# Altium PCB FULL_CB_REV_C.PcbDoc (part 1 of 2)
Units mm, origin at the board's own origin, x right, y up, seen from the top; angles counter-clockwise.
Board outline 86.1 x 38.5 mm, 4 copper layers (Top Layer, Signal Layer 2, Signal Layer 1, Bottom Layer), stack 1.643 mm thick; 96 components, 165 nets, 587 pads, 270 vias.
Unrouted connection lines stored in the file: 6.
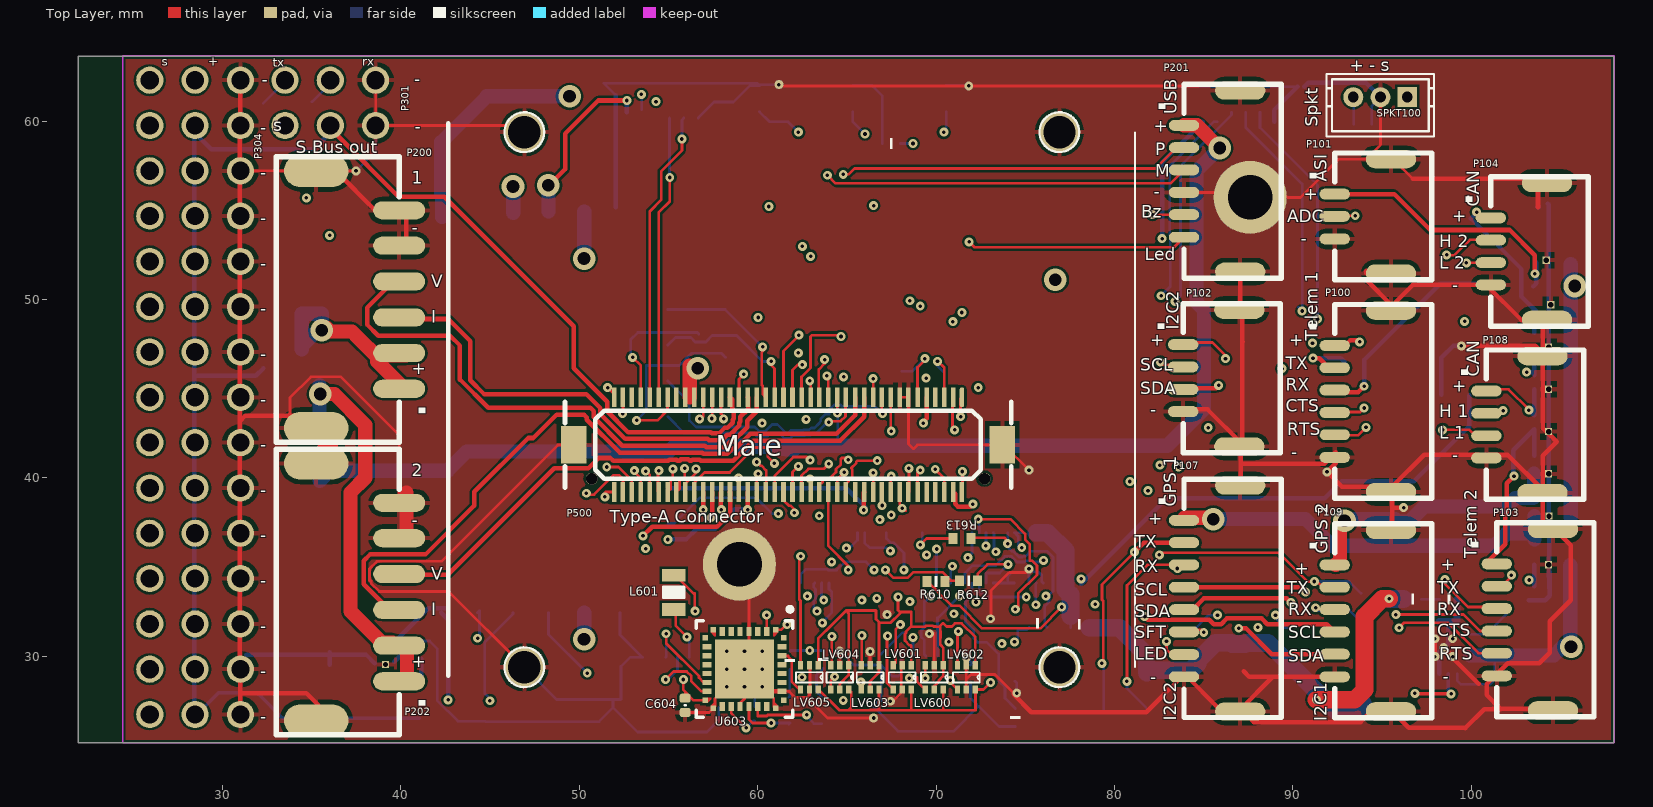
[diagram p0: Top Layer view]
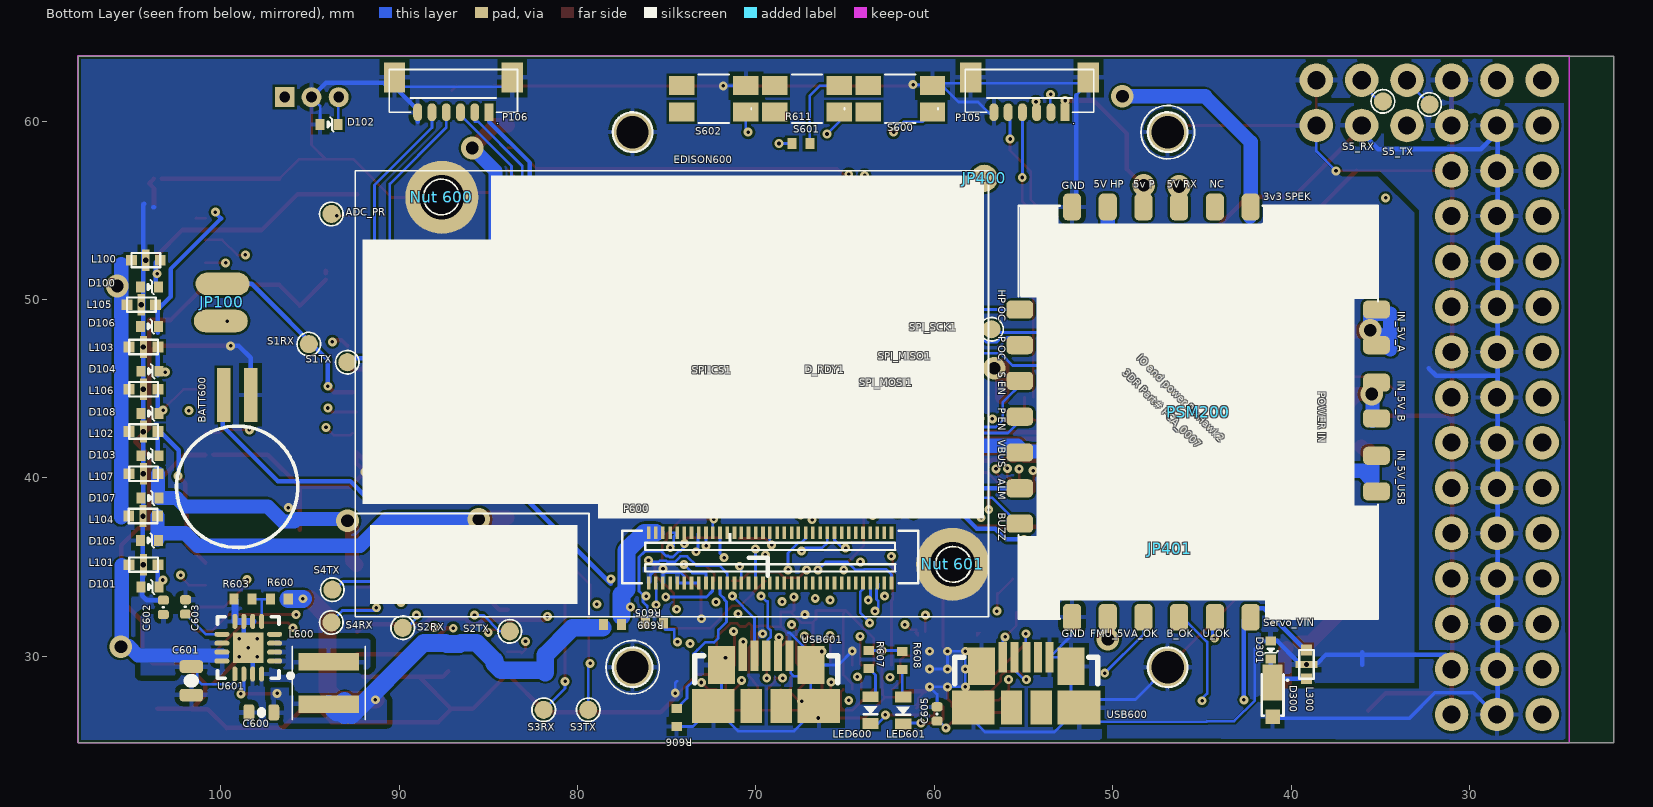
[diagram p1: Bottom Layer view, seen from below]
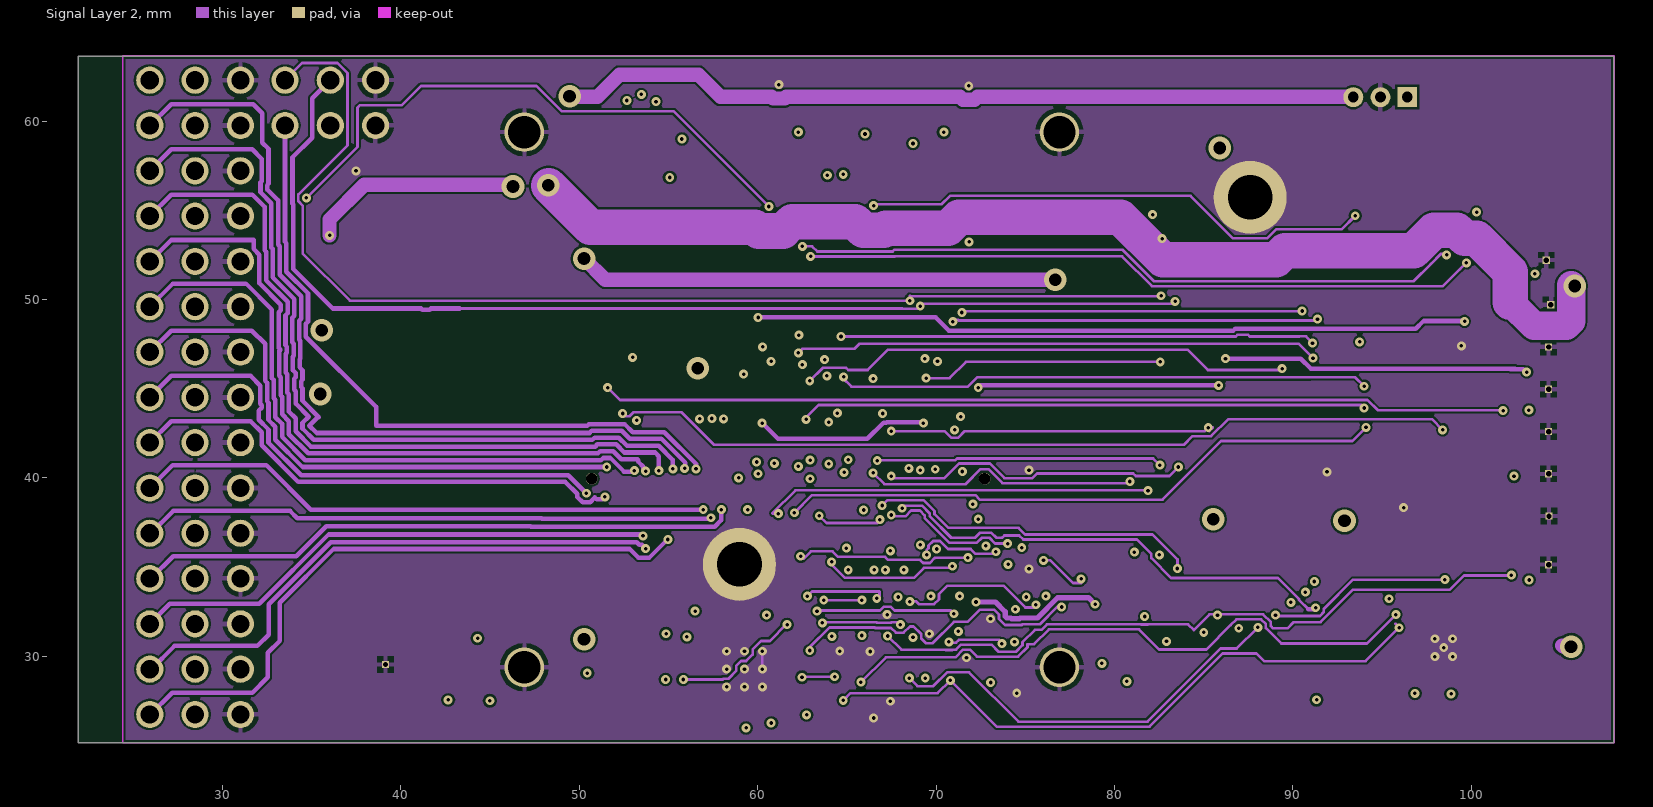
[diagram p2: Signal Layer 2]
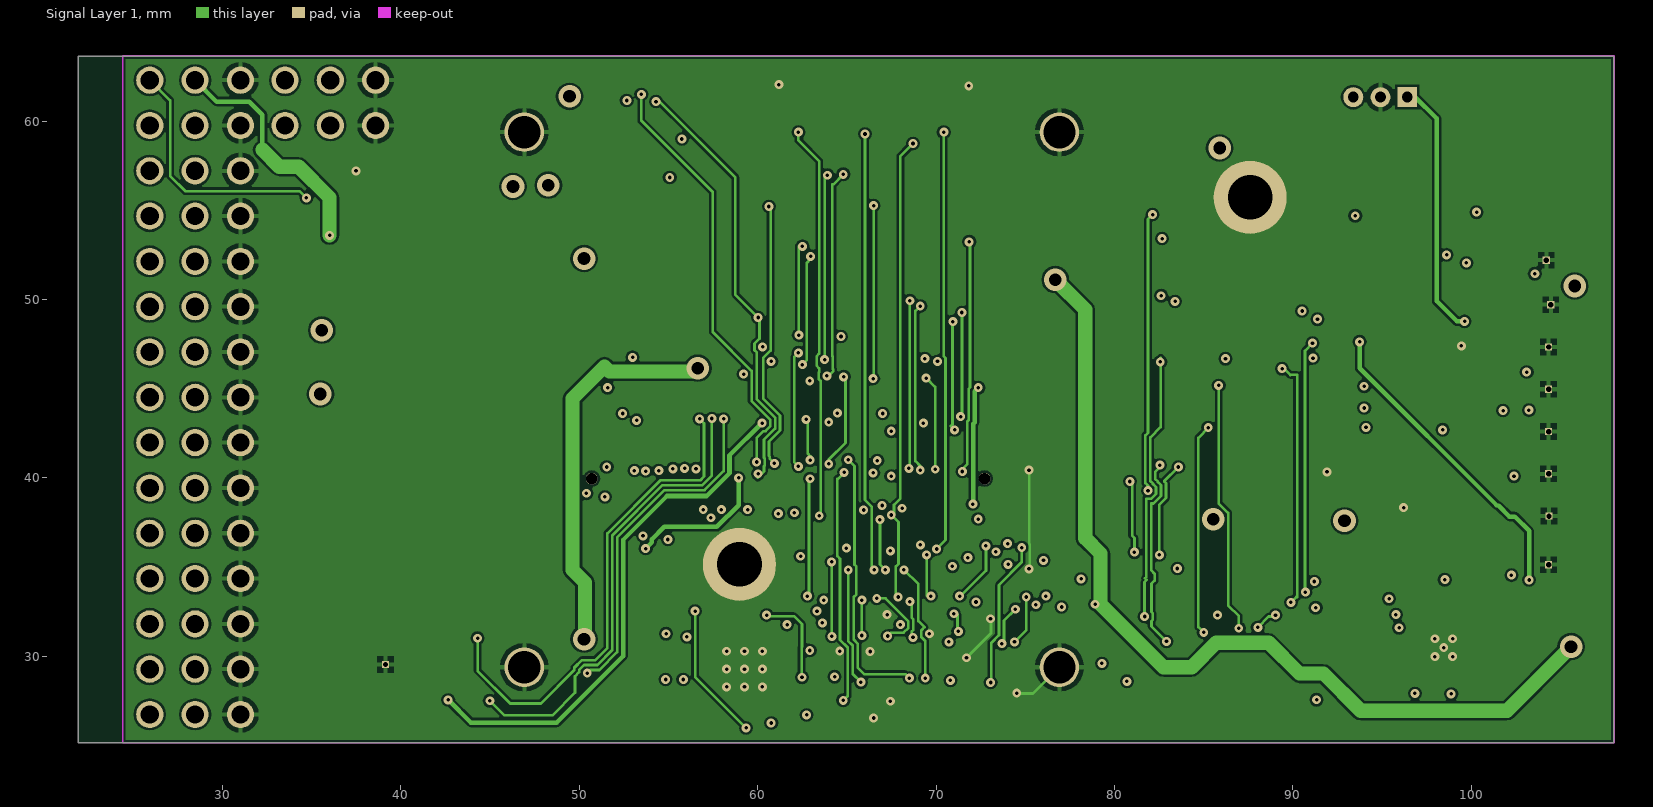
[diagram p3: Signal Layer 1]
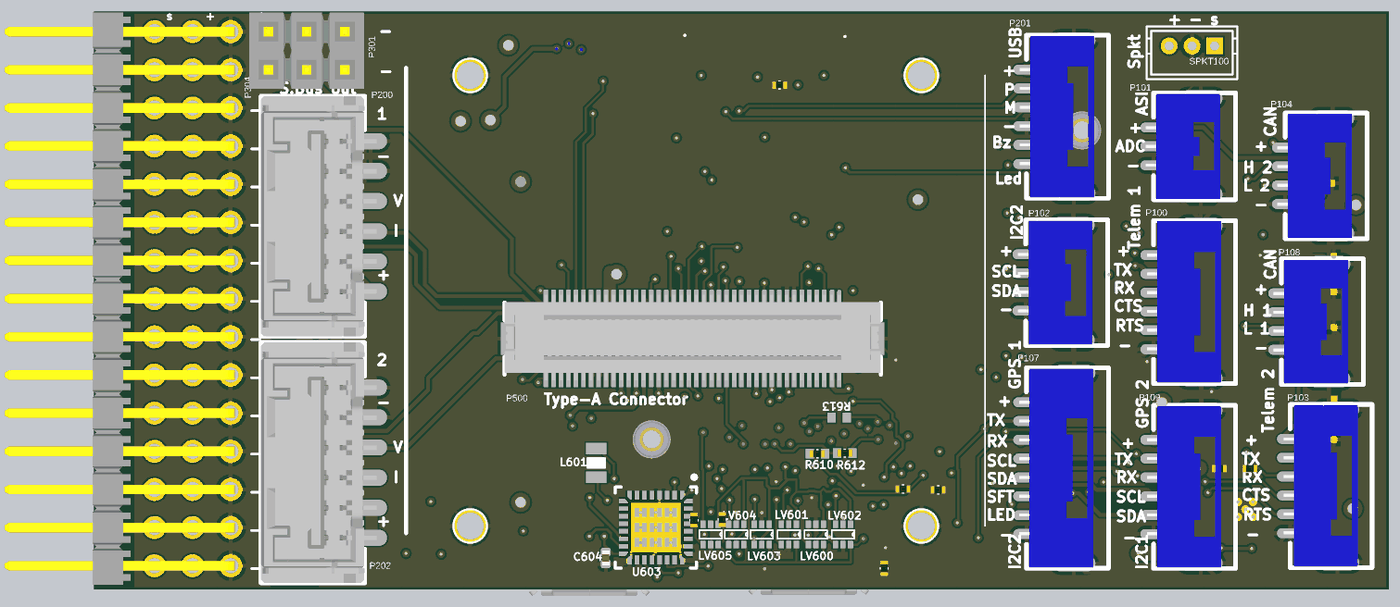
[diagram p5: 3D render of the assembled board from above, using the file's embedded part models]
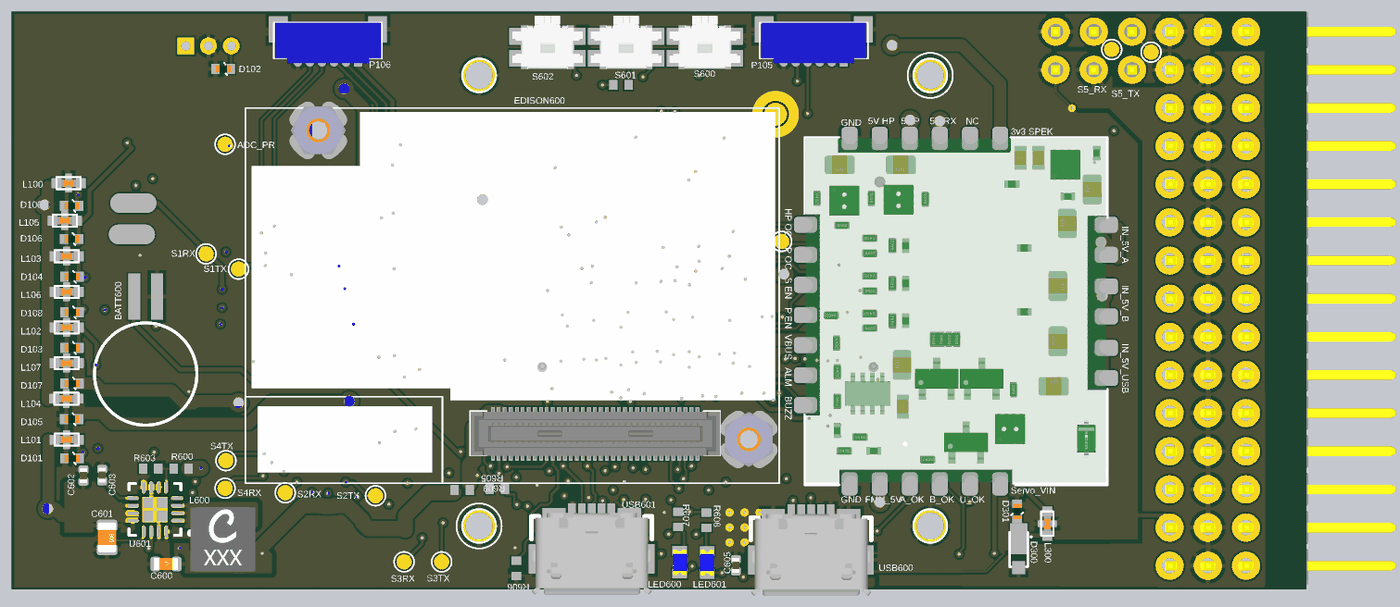
[diagram p6: 3D render of the assembled board from below, using the file's embedded part models]

## Layer stack, top to bottom
Top Solder: solder mask 0.0102, Solder Resist, Dk 3.5
Top Layer: signal copper 0.0356
Dielectric 1: core 0.5, FR-4, Dk 4.8
Signal Layer 2: signal copper 0.036
Dielectric 6: prepreg 0.5, Dk 4.2
Signal Layer 1: signal copper 0.036
Dielectric 4: core 0.5, Dk 4.2
Bottom Layer: signal copper 0.0356
Bottom Solder: solder mask 0.0102, Solder Resist, Dk 3.5

## Board outline
21.9,25.15 108,25.15 108,63.65 21.9,63.65

## Design rules (kind name [scope] priority, off if disabled: settings)
Clearance "Polygon clearance" [InPolygon vs InPolygon] p1: gap=0.3 ignorepadtopadclearanceinfootprint=FALSE except(0: Arc-Hole Track-Hole SMDPad-Hole THPad-Hole Via-Hole Fill-Hole Poly-Hole Region-Hole Text-Hole)
Clearance Clearance_1 [All] p2: gap=0.127 ignorepadtopadclearanceinfootprint=FALSE except(0: Arc-Hole Track-Hole SMDPad-Hole THPad-Hole Via-Hole Fill-Hole Poly-Hole Region-Hole Text-Hole)
Clearance mdViaVia [IsVia vs IsVia] p3: gap=0.127 ignorepadtopadclearanceinfootprint=FALSE except(0: Arc-Hole Track-Hole SMDPad-Hole THPad-Hole Via-Hole Fill-Hole Poly-Hole Region-Hole Text-Hole)
Clearance mdPadVia [IsPad vs IsVia] p4: gap=0.127 ignorepadtopadclearanceinfootprint=FALSE except(0: Arc-Hole Track-Hole SMDPad-Hole THPad-Hole Via-Hole Fill-Hole Poly-Hole Region-Hole Text-Hole)
Clearance mdPadPad [IsPad vs IsPad] p5: gap=0.127 ignorepadtopadclearanceinfootprint=FALSE except(0: Arc-Hole Track-Hole SMDPad-Hole THPad-Hole Via-Hole Fill-Hole Poly-Hole Region-Hole Text-Hole)
Clearance mdWireVia [(InLayerClass('Signal Layers') AND IsTrack) vs IsVia] p6: gap=0.127 ignorepadtopadclearanceinfootprint=FALSE except(0: Arc-Hole Track-Hole SMDPad-Hole THPad-Hole Via-Hole Fill-Hole Poly-Hole Region-Hole Text-Hole)
Clearance mdWirePad [(InLayerClass('Signal Layers') AND IsTrack) vs IsPad] p7: gap=0.127 ignorepadtopadclearanceinfootprint=FALSE except(0: Arc-Hole Track-Hole SMDPad-Hole THPad-Hole Via-Hole Fill-Hole Poly-Hole Region-Hole Text-Hole)
Clearance mdWireWire [(InLayerClass('Signal Layers') AND IsTrack) vs (InLayerClass('Signal Layers') AND IsTrack)] p8: gap=0.127 ignorepadtopadclearanceinfootprint=FALSE except(0: Arc-Hole Track-Hole SMDPad-Hole THPad-Hole Via-Hole Fill-Hole Poly-Hole Region-Hole Text-Hole)
ComponentClearance ComponentClearance_1 [(HasFootprint('ed') OR HasFootprint('CON-DF17-80M') OR HasFootprint('DF40-70_RECEPTICAL') OR HasFootprint('PSM') OR HasFootprint('PEM-SMTSO-M1.6-2-ET') OR HasFootprint('HEADER_1X06-FTDI') OR HasFootprint('3DR-WORDMARK-short'))] p1: gap=0 collisioncheckmode=3 verticalgap=0 showdistances=FALSE
ComponentClearance [All] p2 off: gap=0.076 collisioncheckmode=3 verticalgap=0 showdistances=FALSE
HoleSize [All] p1: absolutevalues=TRUE maxlimit=2540 minlimit=0.2 maxpercent=80.000 minpercent=20.000
HoleToHoleClearance [All] p1: gap=0.203 allowstackedmicrovias=TRUE
MinimumSolderMaskSliver [All] p1 off: minsoldermaskwidth=0.254
PasteMaskExpansion [All] p1: expansion=0.025
PolygonConnect PolygonConnect_1 [(InComponent('U2') OR InComponent('L6') OR HasFootprint('PEM-SMTSO-M1.6-2-ET') OR HasFootprint('MOUNT-HOLE1.8'))] p1: connectstyle=Direct reliefconductorwidth=0.254 reliefentries=4 polygonreliefangle="90 Angle" airgapwidth=0.254
PolygonConnect ThermalVias [IsVia] p2: connectstyle=Direct reliefconductorwidth=0.254 reliefentries=4 polygonreliefangle="90 Angle" airgapwidth=0.254
PolygonConnect [All] p3: connectstyle=Relief reliefconductorwidth=0.254 reliefentries=4 polygonreliefangle="90 Angle" airgapwidth=0.254
RoutingVias [All] p1: holewidth=0.2 width=0.5 viastyle="Through Hole" minholewidth=0.2 minwidth=0.5 maxholewidth=0.711 maxwidth=1.27
SilkToBoardRegionClearance [All] p1 off:
SilkToSilkClearance [All] p1 off: silktosilkclearance=0.254
SilkToSolderMaskClearance [IsPad] p1 off: minsilkscreentomaskgap=0.254 clearancetoexposedcopper=TRUE
SolderMaskExpansion [All] p1: expansion=0.025
Width [All] p1: maxlimit=2 minlimit=0.15 preferedwidth=0.254
22 further rules are at their usual default settings.

## Classes and differential pairs
component class FULL_CB_Plugs_REV_C: 3 D100 D101 D102 D103 D104 D105 D106 D107 D108 JP100 L100 L101 L102 L103 L104 L105 L106 L107 P100 P101 P102 P103 P104 P105 P106 P107 P108 P109 SPKT100
component class FULL_CB_Power_REV_C: P200 P201 P202 PSM200
component class FULL_CB_Servo_REV_C: D300 D301 L300 P301 P304
component class FULL_CB_tp_REV_C: ADC_PR D_RDY1 JP400 JP401 S1RX S1TX S2RX S2TX S3RX S3TX S4RX S4TX S5_RX S5_TX SPI!CS1 SPI_MISO1 SPI_MOSI1 SPI_SCK1
component class FULL_CB_80_Pin_REV_C: FIDUCIALS1 P500
component class FULL_CB_INTEL_REV_C: BATT600 C600 C601 C602 C603 C604 C605 EDISON600 L600 L601 LED600 LED601 LV600 LV601 LV602 LV603 LV604 LV605 "Nut 600" "Nut 601" P600 R600 R603 R605 R606 R607 R608 R609 R610 R611 R612 R613 S600 S601 S602 U601 U603 USB1 USB2 USB600 USB601

## Components (designator, comment, footprint, x,y, rotation, side; value= is the part's Value field where it differs from the comment)
ADC_PR "PAD.04" PAD.04X.04 93.8,54.8 r0 bottom
BATT600 "" MS621FE 99.08,39.503 r90 bottom
C600 "" 0603-CAP 97.727,26.854 r0 bottom
C601 "10.00UF" 0805-CAP 101.651,28.626 r270 bottom
C602 "0u1" 0402-CAP 103.22,32.747 r90 bottom
C603 "33000pf" 0402-CAP 101.976,32.772 r90 bottom
C604 "0u1" 0402-CAP 55.931,27.254 r270 top
C605 "0u1" 0402-CAP 59.842,26.772 r90 bottom
D100 "DIODE-TVS" 0402-TVS 104,50.7 r0 bottom
D101 "DIODE-TVS" 0402-TVS 103.974,33.89 r0 bottom
D102 "DIODE-TVS" 0402-TVS 93.924,59.823 r0 bottom
D103 "DIODE-TVS" 0402-TVS 103.974,41.246 r0 bottom
D104 "DIODE-TVS" 0402-TVS 103.974,45.986 r0 bottom
D105 "DIODE-TVS" 0402-TVS 104,36.5 r0 bottom
D106 "DIODE-TVS" 0402-TVS 104,48.5 r0 bottom
D107 "DIODE-TVS" 0402-TVS 103.974,38.876 r0 bottom
D108 "DIODE-TVS" 0402-TVS 103.974,43.616 r0 bottom
D300 "MSS1P4-M3" MICROSMP 41.037,27.28 r270 bottom
D301 "DIODE-TVS" 0402-TVS 41.139,30.353 r90 bottom
D_RDY1 "PAD.04" PAD.04X.04 68.072,45.974 r180 bottom
EDISON600 "Ed" ED 87.63,55.753 r270 bottom locked
JP100 "HEADER_2MM_RA_SMD" HEADER_2MM_RA_2 100.799,49.846 r90 bottom
JP400 "FIDUCIAL1.5X3" FIDUCIAL-1.5X3 57.2,56.8 r180 bottom
JP401 "FIDUCIAL1.5X3" FIDUCIAL-1.5X3 46.787,36.043 r90 bottom
L100 "Kyocera KNH16C104DA5TS EMI filter" KYOCERA-KNH16-DA 104.211,52.208 r180 bottom
L101 "Kyocera KNH16C104DA5TS EMI filter" KYOCERA-KNH16-DA 104.338,35.135 r180 bottom
L102 "Kyocera KNH16C104DA5TS EMI filter" KYOCERA-KNH16-DA 104.338,42.602 r180 bottom
L103 "Kyocera KNH16C104DA5TS EMI filter" KYOCERA-KNH16-DA 104.338,47.342 r180 bottom
L104 "Kyocera KNH16C104DA5TS EMI filter" KYOCERA-KNH16-DA 104.361,37.863 r180 bottom
L105 "Kyocera KNH16C104DA5TS EMI filter" KYOCERA-KNH16-DA 104.465,49.712 r180 bottom
L106 "Kyocera KNH16C104DA5TS EMI filter" KYOCERA-KNH16-DA 104.338,44.972 r180 bottom
L107 "Kyocera KNH16C104DA5TS EMI filter" KYOCERA-KNH16-DA 104.338,40.232 r180 bottom
L300 "Kyocera KNH16C104DA5TS EMI filter" KYOCERA-KNH16-DA 39.132,29.54 r90 bottom
L600 "XFL4020-222MEB" XFL4020 93.949,28.505 r270 bottom
L601 "" 0805-IND 55.296,33.579 r90 top
LED600 "BLUE" 0603-LED-BLUE 63.576,26.975 r90 bottom
LED601 "BLUE" 0603-LED-BLUE 61.747,26.949 r90 bottom
LV600 "SN74LVC1T45" DRL 70.4,29.5 r270 top
LV601 "SN74LVC1T45" DRL 68.6,29.5 r270 top
LV602 "SN74LVC1T45" DRL 72.2,29.5 r270 top
LV603 "SN74LVC1T45" DRL 66.8,29.5 r270 top
LV604 "SN74LVC1T45" DRL 65.1,29.5 r270 top
LV605 "SN74LVC1T45" DRL 63.4,29.5 r270 top
"Nut 600" "PEM-SMTSO-M1.6-2-ET" PEM-SMTSO-M1.6-2-ET 87.605,55.728 r90 bottom
"Nut 601" "PEM-SMTSO-M1.6-2-ET" PEM-SMTSO-M1.6-2-ET 58.979,35.154 r180 bottom
P100 "JST_GH_V6" JST_GH_V6 97.8,44.3 r270 top
P101 "JST_GH_V3" JST_GH_V3 97.8,54.667 r270 top
P102 "JST_GH_V4" JST_GH_V4 89.3,45.6 r270 top
P103 "JST_GH_V6" JST_GH_V6 106.883,32.055 r270 top
P104 "JST_GH_V4" JST_GH_V4 106.553,52.705 r270 top
P105 "JST_SUR_6" JST_SUR_H6 54.661,62.5 r0 bottom
P106 "JST_SUR_6" JST_SUR_H6 86.961,62.5 r0 bottom
P107 "JST_GH_V8" JST_GH_V8 89.35,33.25 r270 top
P108 "JST_GH_V4" JST_GH_V4 106.3,43 r270 top
P109 "JST_GH_V6" JST_GH_V6 97.8,32 r270 top
P200 "CLICKMATE_2_6" CLICKMATE_V6_2MM 33,50 r90 top
P201 "JST_GH_V6" JST_GH_V6 89.35,56.642 r270 top
P202 "CLICKMATE_2_6" CLICKMATE_V6_2MM 33,33.6 r90 top
P301 "con 2x6" TSW-103-07-G-D 36.04,62.3 r90 top
P304 "PH_2 Servo header" TSW-115-08-G-T-RA 28.46,44.52 r0 top
P500 "CON-DF17-80M" ? 61.697,41.859 r0 top
P600 "DF40-70_RECEPTICAL" DF40-70_RECEPTICAL 69.054,35.56 r90 bottom locked
PSM200 "Power Selection module" PSM 44.958,43.942 r270 bottom
R600 "47K  1%" 0402-RES 96.718,33.204 r180 bottom
R603 "10.5K  1%" 0402-RES 98.75,33.204 r180 bottom
R605 "100K" 0402-RES 75.692,31.852 r180 bottom
R606 "10K" 0402-RES 74.439,26.568 r270 bottom
R607 "220R" 0402-RES 63.678,29.82 r270 bottom
R608 "220R" 0402-RES 61.798,29.769 r270 bottom
R609 "0R" 0402-RES 78.029,31.79 r180 bottom
R610 "10K" 0402-RES 70,34.2 r0 top
R611 "220R" 0402-RES 67.488,58.75 r0 bottom
R612 "220R" 0402-RES 71.831,34.239 r0 top
R613 "10K" 0402-RES 71.45,36.601 r0 top
S1RX "PAD.04" PAD.04X.04 95.067,47.504 r0 bottom
S1TX "PAD.04" PAD.04X.04 92.908,46.488 r0 bottom
S2RX "PAD.04" PAD.04X.04 89.8,31.6 r0 bottom
S2TX "PAD.04" PAD.04X.04 83.8,31.4 r0 bottom
S3RX "PAD.04" PAD.04X.04 81.9,27 r0 bottom
S3TX "PAD.04" PAD.04X.04 79.4,27 r0 bottom
S4RX "PAD.04" PAD.04X.04 93.8,31.9 r180 bottom
S4TX "PAD.04" PAD.04X.04 93.746,33.738 r180 bottom
S5_RX "PAD.04" PAD.04X.04 34.849,61.112 r135 bottom
S5_TX "PAD.04" PAD.04X.04 32.233,60.935 r135 bottom
S600 "Power" EVQP7J01K 61.9,61.265 r0 bottom
S601 "FWR_RCVR" EVQP7J01K 67.132,61.265 r0 bottom
S602 "RCVR_MODE" EVQP7J01K 72.365,61.265 r0 bottom
SPI!CS1 "PAD.04" PAD.04X.04 70.409,45.949 r0 bottom
SPI_MISO1 "PAD.04" PAD.04X.04 58.191,46.761 r0 bottom
SPI_MOSI1 "PAD.04" PAD.04X.04 59.055,45.212 r180 bottom
SPI_SCK1 "PAD.04" PAD.04X.04 56.794,48.336 r90 bottom
SPKT100 "CONN_SPEKTRUM_RX-TH" B3B-ZR 94.914,61.347 r180 top
U601 "TPS62130RGTT" RGT16-1700X1700TP 98.461,30.486 r0 bottom
U603 "FT232RQ-Reel" PQFN5X5-32_V 59.258,29.286 r270 top
USB600 "MICRO USB B, BOTTOM MOUNT" MOLEX-47346-0001 54.839,27.127 r90 bottom
USB601 "MICRO USB B, BOTTOM MOUNT" MOLEX-47346-0001 69.418,27.203 r90 bottom

## Footprints (in the part's own frame and the unit in brackets; to place one, negate y for a bottom-side part, rotate by r counter-clockwise, add the part's x,y. Pads: shape width x height; smd on the part's side, far side on the other; paste and mask are expansions set on the pad)
0402-CAP [mil]
  rrect50% 20x24 smd mask+0: P$1(-15.75,0) P$2(15.75,0)
  silkscreen extent 0,0 0,1, body extent -20,-10 20,10, height 20
0402-RES [mil] "0402-RES"
  rect 20x24 smd: P$1(19.68,0) P$2(-20,0)
  body extent -20,-10 20,10, height 20
0402-TVS [mil] "0402-TVS"
  rect 20x24 smd: A(20,0) C(-19.68,0)
  silkscreen extent -10,-16 3,16, body extent -20,-10 20,10, height 20
0603-CAP [mil] "0603-CAP"
  rrect50% 24x36 smd mask+0: P$1(-27.56,0) P$2(27.56,0)
  silkscreen extent 0,-2 0,2, body extent -31,-16 31,16, height 34
0603-LED-BLUE [mil] "0603-LED_Blue"
  rect 24x36 smd: A(30,0) C(-29.53,0)
  silkscreen extent -9,-15 9,15, body extent -33,-18 33,18, height 35
0805-CAP [mil]
  rrect50% 28x52 smd mask+0: P$1(-31.5,0) P$2(31.5,0)
  silkscreen extent 0,-2 0,2, body extent -39,-25 39,25, height 31
0805-IND [mil]
  rect 28x52 smd: P$1(-37.4,0) P$2(38,0)
  silkscreen extent -12,-23 12,23
B3B-ZR [mil]
  rect 44x44 hole 24: 1(-59.06,0)
  round 44 hole 24: 2(0,0) 3(60,0)
  silkscreen extent -118,-51 119,87
CLICKMATE_V6_2MM [mil]
  rrect100% 40x115 smd: 1(-196.85,-271.65) 2(-118.11,-271.65) 3(-39.37,-271.65) 4(40,-271.65) 5(119,-271.65) 6(197,-271.65)
  rrect100% 71x142 smd: GND(-283.46,-88.58) GND(284,-88.58)
  silkscreen extent -315,-272 315,0, body extent -315,-303 315,0, height 295
DF40-70_RECEPTICAL [mil]
  rect 28x8 smd: 1(-57.09,273.5) 2(54,273.5) 3(-57.09,258.5) 4(54,258.5) 5(-57.09,242.5) 6(54,242.5) 7(-57.09,226.5) 8(54,226.5) 9(-57.09,210.5) 10(54,210.5) 11(-57.09,195.5) 12(54,195.5) 13(-57.09,179.5) 14(54,179.5) 15(-57.09,163.5) 16(54,163.5) 17(-57.09,147.5) 18(54,147.5) 19(-57.09,132.5) 20(54,132.5) 21(-57.09,116.5) 22(54,116.5) 23(-57.09,100.5) 24(54,100.5) 25(-57.09,84.5) 26(54,84.5) 27(-57.09,69.5) 28(54,69.5) 29(-57.09,53.5) 30(54,53.5) 31(-57.09,37.5) 32(54,37.5) 33(-57.09,21.5) 34(54,21.5) 35(-57.09,6.5) 36(54,6.5) 37(-57.09,-9.5) 38(54,-9.5) 39(-57.09,-25.5) 40(54,-25.5) 41(-57.09,-41.5) 42(54,-41.5) 43(-57.09,-56.5) 44(54,-56.5) 45(-57.09,-72.5) 46(54,-72.5) 47(-57.09,-88.5) 48(54,-88.5) 49(-57.09,-104.5) 50(54,-104.5) 51(-57.09,-120.37) 52(54,-120.37) 53(-57.09,-136.12) 54(54,-136.12) 55(-57.09,-151.87) 56(54,-151.87) 57(-57.09,-167.62) 58(54,-167.62) 59(-57.09,-183.37) 60(54,-183.37) 61(-57.09,-199.11) 62(54,-199.11) 63(-57.09,-214.86) 64(54,-214.86) 65(-57.09,-230.61) 66(54,-230.61) 67(-57.09,-246.36) 68(54,-246.36) 69(-57.09,-262.11) 70(54,-262.11)
  silkscreen extent -58,-321 58,332, body extent -68,-322 66,332, height 75
DRL [mm]
  rect 0.45x0.3 smd: 1(0,0) 2(0,-0.5) 3(0,-1) 4(1.35,-1) 5(1.35,-0.5) 6(1.35,0)
  silkscreen extent 0.39,-1.25 0.96,0.25, body extent 0.4,-1.2 1,0.2, height 0.6
ED [mm]
  silkscreen extent -1.47,-4.83 23.53,30.67
EVQP7J01K [mil]
  rect 56x42 smd: A1(-70.87,29) A2(71,29) B3(-70.87,-28.54) B4(71,-28.54)
  silkscreen extent -83,-53 34,54, body extent -93,-83 93,57
FIDUCIAL-1.5X3 [mil]
  rrect100% 60x60 smd paste-78.74: 1(0,0)
HEADER_2MM_RA_2 [mil]
  rrect100% 50x119 smd: 1(-41.19,-31.46) 2(40.8,-35.39)
JST_GH_V3 [mil]
  rrect100% 24x67 smd: 1(-49.21,-214.57) 2(0,-214.57) 3(50,-214.57)
  rrect100% 40x111 smd: GND(-125.98,-90.55) GND(126,-90.55)
  silkscreen extent -140,-215 140,0, body extent -138,-235 138,-40, height 165
JST_GH_V4 [mil]
  rrect100% 24x67 smd: 1(-73.82,-214.57) 2(-24.61,-214.57) 3(25,-214.57) 4(74,-214.57)
  rrect100% 40x111 smd: GND(-150.59,-90.55) GND(151,-90.55)
  silkscreen extent -164,-215 165,0, body extent -162,-235 163,-40, height 165
JST_GH_V6 [mil]
  rrect100% 24x67 smd: 1(-123.03,-214.57) 2(-73.82,-214.57) 3(-24.61,-214.57) 4(25,-214.57) 5(74,-214.57) 6(124,-214.57)
  rrect100% 40x111 smd: GND(-199.8,-90.55) GND(200,-90.55)
  silkscreen extent -214,-215 214,0, body extent -212,-232 212,-37, height 165
JST_GH_V8 [mil]
  rrect100% 24x67 smd: 1(-172.24,-214.57) 2(-123.03,-214.57) 3(-73.82,-214.57) 4(-24.61,-214.57) 5(25,-214.57) 6(74,-214.57) 7(124,-214.57) 8(173,-214.57)
  rrect100% 40x111 smd: GND(-249.02,-90.55) GND(250,-90.55)
  silkscreen extent -263,-215 263,0, body extent -261,-234 261,-39, height 165
JST_SUR_H6 [mm]
  rect 0.5x1 smd: 1(-2,2)
  rrect100% 0.5x1 smd: 2(-1.2,2) 3(-0.4,2) 4(0.4,2) 5(1.2,2) 6(2,2)
  rect 1.2x1.7 smd: GND(-3.3,0.05) GND(3.3,0.05)
  silkscreen extent -3.6,-0.4 3.6,2, body extent -3.5,-0.4 3.5,2.3, height 1.7
KYOCERA-KNH16-DA [mil] "KYOCERA-KNH16-DA"
  rect 16x16 smd: GND(0,-15.75) GND(0,16)
  rect 16x16 hole 12: GND(0,0)
  rect 24x24 smd: P$1(-31.5,0) P$2(32,0)
  silkscreen extent -31,-16 32,16, body extent -20,-10 20,10, height 14
MICROSMP [mil]
  rect 32x32 smd: ANODE(26,0)
  rect 79x44 smd: CATHODE(-49.21,0)
  silkscreen extent -67,-24 24,35
MOLEX-47346-0001 [mil]
  rect 67x18 smd: D+(111,0) D-(111,26) GND(111,-51.18) ID(111,-25.59) VBUS(111,52)
  rect 75x94 smd: GND1(0,117) GND4(0,-116.14)
  rect 83x59 smd: GND2(91,99) GND3(91,-98.43)
  rect 75x47 smd: GND5(0,-32.97) GND6(0,33)
  silkscreen extent 52,-157 111,158, body extent -94,-157 120,157, height 107
MS621FE [mil]
  rect 119x30 smd: 1(203,30) 2(203,-29.53)
  silkscreen extent -134,-134 134,134
PAD.04X.04 [mil]
  rrect100% 40x40 smd paste-78.74: P$1(0,0)
  silkscreen extent -26,-26 26,26
PEM-SMTSO-M1.6-2-ET [mm] "Surface mount thread"
  round 4.1 hole 2.5 paste-2 mask-2: 0(0,0)
  body extent -1.59,-1.83 1.59,1.83, height 2
PQFN5X5-32_V [mm] "QFN, 32-Leads, Body 5x5mm, Pitch 0.5mm, Thermal Pad 3.3x3.3mm, FTDI Recommended"
  rect 0.3x0.3 smd paste-0.15 mask-0.15: 1(-2.2,1.75) 8(-2.2,-1.75) 9(-1.75,-2.2) 16(1.75,-2.2) 17(2.2,-1.75) 24(2.2,1.75) 25(1.75,2.2) 32(-1.75,2.2)
  rect 0.5x0.3 smd paste-0.15 mask+0.06: 2(-2.1,1.25) 3(-2.1,0.75) 4(-2.1,0.25) 5(-2.1,-0.25) 6(-2.1,-0.75) 7(-2.1,-1.25) 18(2.1,-1.25) 19(2.1,-0.75) 20(2.1,-0.25) 21(2.1,0.25) 22(2.1,0.75) 23(2.1,1.25)
  rect 0.3x0.5 smd paste-0.15 mask+0.06: 10(-1.25,-2.1) 11(-0.75,-2.1) 12(-0.25,-2.1) 13(0.25,-2.1) 14(0.75,-2.1) 15(1.25,-2.1) 26(1.25,2.1) 27(0.75,2.1) 28(0.25,2.1) 29(-0.25,2.1) 30(-0.75,2.1) 31(-1.25,2.1)
  rect 3.3x3.3 smd paste-1.65 mask+0.06: 33(0,0)
  Top Layer region: -2.05,-1.6 -1.85,-1.6 -1.85,-1.7 -2.05,-1.9
  Top Layer region: 2.05,-1.6 1.85,-1.6 1.85,-1.7 2.05,-1.9
  Top Layer region: 2.05,1.6 1.85,1.6 1.85,1.7 2.05,1.9
  Top Layer region: -2.05,1.6 -1.85,1.6 -1.85,1.7 -2.05,1.9
  Top Layer region: 1.6,-1.85 1.6,-2.05 1.9,-2.05 1.7,-1.85
  silkscreen extent -3.47,-2.7 2.7,2.7, body extent -2.55,-2.55 2.55,2.55, height 1
PSM [mm]
  rrect50% 1.5x1.016 smd: 5V_HIPOWER(-11.25,-5.318) 5V_PERIPH(-11.25,-3.317) !VBUS_VALID(11.75,0.686) !VDD_BACKUP_VALID(11.75,-1.318) !VDD_BRICK_VALID(11.75,-3.317) GND(-11.25,-7.318) GND(11.75,-7.318) NC(-11.25,0.686) RX(-11.25,-1.318) SERVO_IN(11.75,2.692) SPEK(-11.25,2.692) VDD_5V_IN_PROT(11.75,-5.318)
  rrect50% 1.016x1.5 smd: !VDD_5V_HIPOWER_OC(-5.5,-10.25) !VDD_5V_PERIPH_EN(0.508,-10.25) !VDD_5V_PERIPH_OC(-3.5,-10.25) ALARM(4.521,-10.25) BUZZER_OUT(6.502,-10.25) VBUS(2.515,-10.25) VDD_3V3_SPEKTRUM_EN(-1.5,-10.25) VDD_5V_BACKUP(-1.4,9.75) VDD_5V_BACKUP(0.6,9.75) VDD_BRICK_IN(-5.5,9.75) VDD_BRICK_IN(-3.5,9.75) VDD_VBUS(2.7,9.75) VDD_VBUS(4.7,9.75)
  silkscreen extent -11.33,-10.32 11.9,9.83, body extent -11.3,-10.24 11.66,9.73, height 2.11
RGT16-1700X1700TP [mm] "QFN, 16-Leads, Body 3x3mm, Pitch 0.5mm, Thermal Pad 1.7x1.7mm, TI Recommended"
  oval 0.85x0.28 smd paste-0.025 mask+0.07: 1(-1.475,0.75) 2(-1.475,0.25) 3(-1.475,-0.25) 4(-1.475,-0.75) 9(1.475,-0.75) 10(1.475,-0.25) 11(1.475,0.25) 12(1.475,0.75)
  oval 0.28x0.85 smd paste-0.025 mask+0.07: 5(-0.75,-1.475) 6(-0.25,-1.475) 7(0.25,-1.475) 8(0.75,-1.475) 13(0.75,1.475) 14(0.25,1.475) 15(-0.25,1.475) 16(-0.75,1.475)
  rect 1.7x1.7 smd paste-0.85 mask+0.07: 17(0,0)
  silkscreen extent -2.5,-1.73 1.73,1.73, body extent -1.57,-1.57 1.58,1.58, height 1
TSW-103-07-G-D [mil] "2x6 pin"
  round 60 / inner round 60 / far side round 74.02 hole 40.16: 1(-100,100) 2(0,100) 3(-100,0) 4(0,0) 5(-100,-100) 6(0,-100)
  body extent -150,-150 50,150, height 330
TSW-115-08-G-T-RA [mil] "15 pin head"
  round 60 / inner round 60 / far side round 74.02 hole 40.16: 1(-100,-700) 2(-100,-600) 3(-100,-500) 4(-100,-400) 5(-100,-300) 6(-100,-200) 7(-100,-100) 8(-100,0) 9(-100,100) 10(-100,200) 11(-100,300) 12(-100,400) 13(-100,500) 14(-100,600) 15(-100,700) GND(100,-700) GND(100,-600) GND(100,-500) GND(100,-400) GND(100,-300) GND(100,-200) GND(100,-100) GND(100,0) GND(100,100) GND(100,200) GND(100,300) GND(100,400) GND(100,500) GND(100,600) GND(100,700) "RX 5V"(0,700) "SERVO VCC"(0,-700) "SERVO VCC"(0,-600) "SERVO VCC"(0,-500) "SERVO VCC"(0,-400) "SERVO VCC"(0,-300) "SERVO VCC"(0,-200) "SERVO VCC"(0,-100) "SERVO VCC"(0,0) "SERVO VCC"(0,100) "SERVO VCC"(0,200) "SERVO VCC"(0,300) "SERVO VCC"(0,400) "SERVO VCC"(0,500) "SERVO VCC"(0,600)
  body extent -492,-750 110,750, height 268
XFL4020 [mm] "Precision Wire Wound Inductor, 2-Leads, Body 4.00x4.00mm, IPC Medium Density"
  rect 0.98x3.4 smd: 1(-1.185,0) 2(1.185,0)
  silkscreen extent -2.05,-2.05 2.05,2.05, body extent -2.15,-2.15 2.15,2.15, height 2.1
? [mil]
  rrect100% 10x44 smd: 1(384,105)
  rect 10x44 smd: 2(384,-104.33) 3(365,105) 4(365,-104.33) 5(345,105) 6(345,-104.33) 7(325,105) 8(325,-104.33) 9(306,105) 10(306,-104.33) 11(286,105) 12(286,-104.33) 13(266,105) 14(266,-104.33) 15(247,105) 16(247,-104.33) 17(227,105) 18(227,-104.33) 19(207,105) 20(207,-104.33) 21(188,105) 22(188,-104.33) 23(168,105) 24(168,-104.33) 25(148,105) 26(148,-104.33) 27(128,105) 28(128,-104.33) 29(109,105) 30(109,-104.33) 31(89,105) 32(89,-104.33) 33(69,105) 34(69,-104.33) 35(50,105) 36(50,-104.33) 37(30,105) 38(30,-104.33) 39(10,105) 40(10,-104.33) 41(-9.84,105) 42(-9.84,-104.33) 43(-29.53,105) 44(-29.53,-104.33) 45(-49.21,105) 46(-49.21,-104.33) 47(-68.9,105) 48(-68.9,-104.33) 49(-88.58,105) 50(-88.58,-104.33) 51(-108.27,105) 52(-108.27,-104.33) 53(-127.95,105) 54(-127.95,-104.33) 55(-147.64,105) 56(-147.64,-104.33) 57(-167.32,105) 58(-167.32,-104.33) 59(-187.01,105) 60(-187.01,-104.33) 61(-206.69,105) 62(-206.69,-104.33) 63(-226.38,105) 64(-226.38,-104.33) 65(-246.06,105) 66(-246.06,-104.33) 67(-265.75,105) 68(-265.75,-104.33) 69(-285.43,105) 70(-285.43,-104.33) 71(-305.12,105) 72(-305.12,-104.33) 73(-324.8,105) 74(-324.8,-104.33) 75(-344.49,105) 76(-344.49,-104.33) 77(-364.17,105) 78(-364.17,-104.33) 79(-383.86,105) 80(-383.86,-104.33)
  round 87 hole 71: GND(-582,-491) GND(-582,690) GND(599,-491) GND(599,690)
  rect 56x83 smd: GND(-472.44,0) GND(473,0)
  round 26 hole 26 unplated: hole-1(-433.07,-74.8) hole-2(434,-74.8)
  silkscreen extent -626,-535 643,734, body extent -492,-109 492,115, height 124

## Part data
BATT600: library part MS621FE
C600: library part CAP0603
C601: library part CAP0805, "CAPC,X5R,0805,10.00UF,25.00V,+/-10%"
C602: library part CAP0402
C603: library part CAP0402, "CAPC,X5R,0402,0.033UF,6.3V,+/- 10%"
C604 C605: library part CAP0402, "<b>Capacitor</b> / Standard 0603 ceramic capacitor, and 0.1\" leaded capacitor."
D100 D101 D102 D103 D104 D105 D106 D107 D108 D301: "Diode, TVS, 14VWM, 40VC, 0402, SMD"
D300: library part DIODE-SCHOTTKY_MSMP, "Diode, Schottky, 40V, 1A, MicroSMP, SMD"
JP100: "Connector, PCB, 2MM, 2Pos, R/A, SMD, Au"
JP400 JP401: "<b>Fiducial Alignment Points</b> / Various fiducial points for machine vision alignment."
L100 L101 L102 L103 L104 L105 L106 L107 L300: library part KNH16C104DA5TS, "Capacitor, Filter, 0.1uF, 25V, 2A, 0603, SMD"
L600: library part INDUCTOR-XFL4020
L601: library part INDUCTOR0805
LED600 LED601: library part LED0603, "<b>LEDs</b> / Standard schematic elements and footprints for 5mm, 3mm, 1206, and 0603 sized LEDs. 5mm - Spark Fun Electronics SKU : COM-00529 (and others)"
"Nut 600" "Nut 601": "Fastener, M1.6x0.35mm, 8.00MM Pitch, SMTSO, CS"
P100 P103 P109 P201: "BM06B-GHS-TBT"
P101: "BM03B-GHS-TBT"
P102 P104 P108: "BM04B-GHS-TBT"
P105 P106: "Connector, Header, 6Pos, .8mm IDC, R/A, SMD, Tin"
P107: "BM08B-GHS-TBT"
P200 P202 P301: "Connector, Header, 6Pos, 2.54MM, Vert, THT, Au"
P304: "Connector, Header, 45Pos, 2.54MM, R/A, THT, Tin"
P500: "Connector, Header, 80Pos, .5MM, DUAL, SMD, Au"
PSM200: library part PSMPSM, "PCA, PSM, PX4, Assembly"
R600 R603 R605 R606 R609 R610 R611 R612 R613: library part RESISTOR0402-RES
R607 R608: library part RESISTOR0402-RES, "<b>Resistor</b> / Basic schematic elements and footprints for 0603, 1206, and PTH 1/10th watt (small) resistors."
S600 S601 S602: library part SWITCH-MOMENTARY-2
SPKT100: "Spektrum RX connector; JST ZH series S3B-ZR-SM4A-TF"
U601: "Buck Step Down Regulator with 3 to 17 V Input and 0.9 to 6 V Output, -40 to 85 degC, 16-Pin QFN (RGT), Green (RoHS & no Sb/Br)"
U603: "USB UART Asynchronous Serial Data Transfer Chip, 32-pin QFN, Tape and Reel"
USB600 USB601: library part MOLEX-47346-0001

## Via types
v1: diameter 0.5, hole 0.2, Top Layer to Bottom Layer, tented both sides, 241 vias
v2: diameter 0.5, hole 0.2, Top Layer to Bottom Layer, 15 vias
v3: diameter 1.27, hole 0.711, Top Layer to Bottom Layer, tented both sides, 14 vias

## Nets (pads, with @x,y where several pads share a name; then routed paths per layer and width w, separated by ;. In a path a pad name is that pad's centre, name@x,y a point inside that pad or via, vN(x,y) a via of type N, cw(c..) or ccw(c..) an arc to the next point about the centre after c; other vN are vias at no path point)
1V8: LV600.1 LV600.5 LV601.1 LV602.1 LV603.1 LV603.5 LV604.1 LV604.5 LV605.1 P600.12 R605.P$2 R611.P$2 R613.P$1 | length 75.6
  Top Layer w0.15: LV605.1@63.4,29.5 63.4,31.019 63.806,31.425 63.814,31.425 64.945,32.556 64.945,32.564 ; LV604.5@64.6,28.15 64.6,28.456 65.1,28.956 LV604.1@65.1,29.5 65.1,32.41 64.945,32.564 ; LV603.5@66.3,28.15 66.3,28.581 66.8,29.081 LV603.1@66.8,29.5 66.8,31.913 ; v1(67.869,33.325) 67.869,32.588 67.974,32.483 ; LV601.1@68.6,29.5 68.6,30.583 68.571,30.612 68.52,30.612 68.255,30.877 68.255,31.251 68.316,31.313 68.316,31.379 68.6,31.663 ; LV600.5@69.9,28.15 69.9,28.341 70.15,28.591 70.15,28.634 70.4,28.884 LV600.1@70.4,29.5 70.4,30.485 70.262,30.623 70.262,30.625 70.232,30.655 70.232,31.01 70.251,31.029 70.251,31.404 70.232,31.423 70.232,31.693 70.4,31.86 70.592,31.669 70.882,31.669 71.06,31.846 71.434,31.846 72.2,31.081 LV602.1@72.2,29.5 ; 70.203,31.663 69.992,31.663 69.986,31.669 69.859,31.669 69.809,31.719 69.434,31.719 69.378,31.663 68.6,31.663 ; R613.P$1@71.95,36.601 71.996,36.647 73.843,36.647 74.016,36.474 v1(74.016,36.322) ; 64.945,32.564 66.63,32.564 66.63,32.083 66.8,31.913 ; 66.8,31.913 66.831,31.882 67.446,31.882 67.974,32.41 67.974,32.483 ; 67.974,32.483 68.6,32.483 68.6,31.663
  Signal Layer 2 w0.15: v1(67.488,37.922) 67.559,37.851 68.285,37.851 68.604,38.171 69.097,38.171 69.362,37.906 69.362,37.744 70.737,36.37 72.286,36.37 72.563,36.647 72.984,36.647 73.309,36.322 v1(74.016,36.322)
  Signal Layer 1 w0.15: v1(67.488,37.922) 67.889,37.521 67.889,35.178 67.747,35.036 67.747,33.447 v1(67.869,33.325) ; v1@67.645,37.922 67.645,38.49 67.996,38.841 67.996,58.039 v1(68.707,58.75)
  Bottom Layer w0.15: 67.996,58.75 v1(68.707,58.75) ; v1@74.02,36.115 74.252,35.883 74.343,35.883 74.66,35.565 74.844,35.565 74.907,35.629 75.028,35.629 75.29,35.89 76.225,35.89 76.551,35.564 76.551,33.651 76.306,33.405 76.187,33.405 v1(76.159,33.377) ; v1@74.02,36.322 P600.12@74.02,36.932 ; R605.P$2@76.225,31.623 76.098,31.75 76.098,32.817 76.327,33.045 v1@76.327,33.452
3V3: LV600.6 LV601.6 LV602.6 LV603.6 LV604.6 LV605.6 P600.8 P600.10 | length 26.1
  Top Layer w0.15: LV605.6@63.4,28.15 64.574,26.976 66.291,26.976 66.31,26.995 66.684,26.995 66.703,26.976 72.214,26.976 72.214,28.136 72.662,28.136 v1(73.059,28.533) ; 65.1,27.002 65.247,27.149 65.247,28.003 LV604.6@65.1,28.15 ; 66.8,27 LV603.6@66.8,28.15 ; 68.6,26.982 LV601.6@68.6,28.15 ; 70.4,26.993 LV600.6@70.4,28.15
  Signal Layer 1 w0.15: v1(73.059,28.533) 73.093,28.533 73.093,30.755 73.528,31.19 73.528,34.001 74.803,35.276 v1(74.803,36.093)
  Bottom Layer w0.15: v1(74.803,36.093) 74.803,36.068 74.778,36.043 74.778,36.017 74.625,36.17 74.6,36.17 74.6,36.732 P600.10@74.401,36.932 P600.8@74.807,36.932
4V38: C600.P$1 L600.2 R600.P$2 R609.P$2 U601.14 | length 33.3
  Top Layer w0.2: v1@96.87,27.896 v1(98.877,27.896)
  Top Layer w1: v1(91.333,27.565) 93.467,27.565 94.025,28.124 94.025,32.239 95.016,33.23 v1(95.397,33.23)
  Bottom Layer w0.2: U601.14@98.711,29.011 98.711,28.062 v1(98.877,27.896)
  Bottom Layer w1: R609.P$2@78.6,31.6 80.279,31.6 81.813,30.066 81.813,29.101 81.93,29.218 84.292,29.218 84.659,29.585 84.659,29.757 85.662,30.759 86.542,30.759 86.606,30.695 87.333,30.695 87.397,30.759 87.66,30.759 87.673,30.746 88.4,30.746 88.413,30.759 88.617,30.759 92.676,26.7 ; 93.06,26.706 93.06,27.502 93.483,27.079 93.483,26.854 L600.2@93.949,27.32 ; v1(95.397,33.23) 95.409,33.218 96.196,33.218 96.21,33.204
  other v1: 96.845,27.921
5V_PRES: D100.C L100.P$2 P101.1 | length 15.1
  Top Layer w0.254: P101.1@92.35,55.917 95.683,55.917 97.7,53.9 102.155,53.9 103.568,52.488 v1(103.568,51.446)
  Bottom Layer w0.254: D100.C@103.474,50.735 103.644,50.905 L100.P$2@103.644,52.081
ALARM: P500.24 PSM200.ALARM | length 12.7
  Top Layer w0.254: v1(65.938,38.202) 65.938,39.184 P500.24@65.964,39.209
  Bottom Layer w0.254: PSM200.ALARM@54.958,39.421 64.973,39.421 66.015,38.379 66.015,38.278 v1(65.938,38.202)
AUX_BATT_CURRENT_SENS: P202.3 P500.25 | length 39
  Top Layer w0.254: P202.3@39.98,32.579 P202.3@40.342,32.579 ; P202.3@40.317,32.5 39.45,32.5 37.908,34.042 37.908,35.352 38.268,35.712 41.377,35.712 44.116,38.452 44.116,39.219 47.137,42.24 47.414,42.24 48.722,43.548 50.263,43.548 50.423,43.389 50.423,43.258 52.257,41.423 56.882,41.423 56.954,41.351 58.305,41.351 58.614,41.66 58.772,41.66 59.58,42.468 64.403,42.468 65.456,43.52 P500.25@65.456,44.526
AUX_BATT_VOLTAGE_SENS: P202.4 P500.23 | length 30.7
  Top Layer w0.254: P202.4@40.317,34.569 42.621,34.569 48.603,40.551 50.513,40.551 51.081,41.119 51.745,41.119 51.894,40.97 54.989,40.97 55.036,41.017 55.454,41.017 55.501,40.97 55.624,40.97 55.697,41.042 56.114,41.042 56.186,40.97 56.285,40.97 56.332,41.017 56.749,41.017 56.796,40.97 58.621,40.97 59.737,42.087 64.616,42.087 65.964,43.434 P500.23@65.964,44.526
BATT_CURRENT_SENS_PROT: P200.3 P500.49 | length 25.1
  Top Layer w0.254: P200.3@40.292,48.911 42.656,48.911 43.891,47.676 43.891,45.471 44.659,44.704 50.389,44.704 51.185,43.908 51.185,43.573 52.573,42.185 57.197,42.185 57.269,42.113 57.989,42.113 58.298,42.422 58.456,42.422 58.975,42.94 58.975,43.099 59.03,43.154 59.03,43.429 59.461,43.86 59.461,44.511 P500.49@59.447,44.526
BATT_VOLTAGE_SENS_PROT: P200.4 P500.47 | length 31.6
  Top Layer w0.254: P200.4@40.342,50.927 39.49,50.927 38.1,49.537 38.1,48.6 38.719,47.981 42.748,47.981 43.307,47.422 43.307,45.517 44.895,43.929 50.625,43.929 50.804,43.75 50.804,43.416 52.415,41.804 57.039,41.804 57.112,41.732 58.147,41.732 58.456,42.041 58.614,42.041 59.356,42.783 59.356,42.799 59.372,42.799 59.411,42.837 59.411,43.205 59.969,43.764 59.947,43.787 P500.47@59.947,44.526
BUZZER_OUT: P201.5 PSM200.BUZZER_OUT | length 46.6
  Top Layer w0.15: v1(82.135,54.762) P201.5@83.9,54.762
  Signal Layer 2 w0.15: v1(61.163,37.998) 60.858,37.998 60.833,38.024 62.118,39.309 81.866,39.309 v1(81.881,39.294)
  Signal Layer 1 w0.15: v1(81.881,39.294) 81.881,39.562 81.729,39.715 81.729,42.378 81.881,42.53 81.881,54.508 v1(82.135,54.762)
  Bottom Layer w0.15: PSM200.BUZZER_OUT@54.958,37.44 54.969,37.451 55.307,37.451 56.744,38.887 59.919,38.887 60.808,37.998 v1(61.163,37.998)
CAN_H_1: P108.2 P500.79 | length 51.4
  Top Layer w0.15: v1(51.587,45.06) 51.947,44.7 P500.79@51.947,44.526
  Signal Layer 2 w0.15: v1(51.587,45.06) 52.278,44.369 91.703,44.369 ; 91.71,44.375 94.187,44.375 94.766,43.796 v1@101.79,43.796
  other v1: 101.79,43.776
CAN_H_2: P104.2 P500.41 | length 49.3
  Top Layer w0.15: P500.41@61.447,44.526 61.447,47.121 62.306,47.981 v1(62.306,48.006) ; v1(98.623,52.508) 98.643,52.488 99.072,52.488 99.935,53.351 100.825,53.351 P104.2@100.861,53.316
  Signal Layer 2 w0.15: v1(62.509,52.984) 63.047,52.984 63.34,52.691 67.565,52.691 67.672,52.798 71.658,52.798 71.669,52.786 80.464,52.786 82.224,51.027 96.767,51.027 97.735,51.995 ; 97.735,52.001 98.293,52.559 v1@98.623,52.559
  Signal Layer 1 w0.15: v1(62.306,48.006) 62.306,52.984 62.357,53.035 62.459,53.035 v1(62.509,52.984)
CAN_L_1: P108.3 P500.77 | length 51.2
  Top Layer w0.15: v1(52.426,43.612) 52.447,43.633 P500.77@52.447,44.526 ; v1(98.4,42.7) 99.893,42.7 100.062,42.531 P108.3@100.861,42.531
  Signal Layer 2 w0.15: v1(52.426,43.612) 52.426,43.561 52.527,43.459 52.802,43.459 53.026,43.683 55.729,43.683 57.551,41.86 83.904,41.86 84.388,42.344 85.425,42.344 86.381,43.3 97.8,43.3 v1(98.4,42.7)
CAN_L_2: P104.3 P500.39 | length 47.6
  Top Layer w0.15: P500.39@61.951,44.526 61.951,46.05 62.255,46.355 v1(62.509,46.355) ; v1@99.808,52.132 99.885,52.056 P104.3@100.861,52.056
  Signal Layer 2 w0.15: v1(62.967,52.426) 62.978,52.414 67.68,52.414 67.691,52.426 80.433,52.426 82.109,50.75 98.412,50.75 99.38,51.718 ; 99.38,51.704 v1(99.732,52.056)
  Signal Layer 1 w0.15: v1(62.509,46.355) 62.748,46.594 62.748,46.899 62.758,46.909 62.758,52.065 62.967,52.273 v1(62.967,52.426)
E\X\T\E\R\N\_\C\S\: P500.5 SPI!CS1.P$1 | length 2.9
  Top Layer w0.15: v1(70.079,46.533) 70.104,46.533 70.46,46.177 P500.5@70.46,44.526
  Bottom Layer w0.15: v1(70.079,46.533) 70.079,46.279 SPI!CS1.P$1@70.409,45.949
EXTERN_DRDY: D_RDY1.P$1 P500.11 | length 3.9
  Top Layer w0.15: P500.11@68.961,44.526 68.961,46.203 69.367,46.609 v1(69.367,46.685)
  Bottom Layer w0.15: D_RDY1.P$1@68.072,45.974 68.656,45.974 v1(69.367,46.685)
F\M\U\-\L\E\D\_\A\M\B\E\R\: P201.6 P500.2 | length 26.6
  Top Layer w0.152: P500.2@71.45,39.209 71.476,39.235 v1(71.476,40.361) ; v1(71.857,53.238) 72.161,52.934 83.341,52.934 P201.6@83.9,53.492
  Signal Layer 1 w0.152: v1(71.476,40.361) 71.476,40.513 71.755,40.792 71.755,43.174 71.827,43.246 71.827,44.989 71.903,45.065 71.903,53.192 v1(71.857,53.238)
FAULT: P600.19 R605.P$1 | length 7.5
  Signal Layer 1 w0.15: v1(74.397,30.81) 75.057,31.471 v1(75.057,33.325)
  Bottom Layer w0.15: P600.19@72.419,34.11 72.419,33.676 72.771,33.325 v1(75.057,33.325) ; v1(74.397,30.81) 74.574,30.988 74.574,31.506 75.101,31.506 R605.P$1@75.217,31.623
FMU-!RESET: P500.7
FMU-CH1-PROT: P304.1 P500.50 | length 41.7
  Top Layer w0.254: v1(59.436,38.227) 59.447,38.238 P500.50@59.447,39.209
  Signal Layer 2 w0.254: P304.1@25.92,26.74 25.953,26.74 27.178,27.965 31.674,27.965 32.537,28.829 32.537,30.201 33.198,30.861 33.198,32.995 36.22,36.017 52.832,36.017 53.311,35.539 53.93,35.539 54.942,36.551 v1(54.966,36.551)
  Bottom Layer w0.254: v1(54.966,36.551) 55.982,36.551 56.591,37.16 57.609,37.16 58.701,38.252 59.411,38.252 v1(59.436,38.227)
FMU-CH2-PROT: P304.2 P500.52 | length 40.6
  Top Layer w0.15: v1(58.928,40.005) 58.953,40.03 58.953,39.216 P500.52@58.947,39.209
  Signal Layer 2 w0.254: P304.2@25.92,29.28 26.003,29.28 27.305,30.582 31.953,30.582 32.588,31.217 32.588,32.924 36.063,36.398 53.211,36.398 53.36,36.25 53.514,36.25 v1(53.721,36.043) ; v1(58.928,40.005) v1@58.953,40.03
  Signal Layer 1 w0.254: v1(53.721,36.043) 54.073,36.394 54.073,36.572 54.762,37.262 57.71,37.262 58.928,38.479 v1(58.928,40.005)
FMU-CH3-PROT: P304.3 P500.54 | length 36.4
  Top Layer w0.254: v1(53.569,36.754) 54.081,37.266 57.714,37.266 58.467,38.018 58.467,39.189 P500.54@58.447,39.209
  Signal Layer 2 w0.254: P304.3@25.92,31.82 27.044,32.944 32.055,32.944 35.941,36.83 53.492,36.83 v1(53.569,36.754)
FMU-CH4-PROT: P304.4 P500.56 | length 35.5
  Top Layer w0.15: P500.56@57.947,38.738 P500.56@57.947,39.209
  Top Layer w0.254: P500.56@57.937,39.2 57.937,38.252 v1(57.963,38.227)
  Signal Layer 2 w0.254: P304.4@25.92,34.36 25.978,34.36 27.229,35.611 34.138,35.611 35.814,37.287 47.269,37.287 47.291,37.266 57.587,37.266 57.963,37.641 v1(57.963,38.227)
FMU-CH5-PROT: P304.5 P500.58 | length 33.6
  Top Layer w0.254: v1(57.379,37.77) 57.451,37.842 57.451,39.205 P500.58@57.447,39.209
  Signal Layer 2 w0.254: P304.5@25.92,36.9 25.978,36.9 27.229,38.151 33.782,38.151 34.188,37.744 47.879,37.744 ; 47.901,37.723 57.332,37.723 v1(57.379,37.77)
FMU-CH6-PROT: P304.6 P500.60 | length 33.6
  Top Layer w0.254: v1(56.947,38.227) P500.60@56.947,39.209
  Signal Layer 2 w0.254: P304.6@25.92,39.44 27.196,40.716 32.461,40.716 34.95,38.227 v1(56.947,38.227)
FMU-SWCLK: P106.5 P500.3 | length 41.5
  Top Layer w0.15: P500.3@70.968,44.526 70.922,44.481 70.922,42.819 v1(71.044,42.697)
  Signal Layer 2 w0.15: v1(70.942,48.768) 70.942,48.844 70.968,48.87 71.217,48.87 71.263,48.824 v1@91.306,48.824
  Signal Layer 1 w0.15: v1(70.942,48.768) 70.942,48.743 70.922,48.722 70.922,43.007 70.815,42.901 71.018,42.697 v1(71.044,42.697)
  Bottom Layer w0.15: P106.5@88.161,60.5 88.161,59.639 91.384,56.416 v1(91.384,48.901)
FMU-SWDIO: P106.4 P500.1 | length 39.1
  Top Layer w0.15: v1(71.374,43.434) 71.374,44.45 P500.1@71.45,44.526
  Signal Layer 2 w0.15: v1(71.45,49.276) 71.425,49.301 71.425,49.352 v1@90.514,49.352
  Signal Layer 1 w0.15: v1(71.374,43.434) 71.45,43.358 v1(71.45,49.276)
  Bottom Layer w0.15: P106.4@87.361,60.5 87.361,59.639 90.52,56.48 v1(90.52,49.359) 90.317,49.562
FW_RCVR: P600.69 S601.A1 | length 31.3
  Signal Layer 1 w0.15: v1(66.015,59.284) 66.015,38.765 66.39,38.389 66.39,34.981 v1(66.523,34.849)
  Bottom Layer w0.15: P600.69@62.396,34.11 62.396,34.583 62.687,34.874 63.928,34.874 63.961,34.841 64.428,34.841 64.888,35.301 66.071,35.301 v1(66.523,34.849) ; S601.A1@65.332,60.528 65.332,59.966 v1(66.015,59.284)
GND: "Nut 600.0" "Nut 601.0" BATT600.2 C600.P$2 C601.P$2 C602.P$2 C603.P$2 C604.P$2 C605.P$2 D100.A D101.A D102.A D103.A D104.A D105.A D106.A D107.A D108.A D301.A L100.GND L101.GND L102.GND L103.GND L104.GND L105.GND L106.GND L107.GND L300.GND LV600.2 LV601.2 LV601.5 LV602.2 LV602.5 LV603.2 LV604.2 LV605.2 LV605.5 P100.6 P100.GND P101.3 P101.GND P102.4 P102.GND P103.6 P103.GND P104.4 P104.GND P105.6 P105.GND P106.6 P106.GND P107.8 P107.GND P108.4 P108.GND P109.6 P109.GND P200.5 P200.6 P200.GND P201.4 P201.GND P202.5 P202.6 P202.GND P301.5 P301.6 P304.GND P500.13 P500.15 P500.GND P600.1 P600.5 P600.9 P600.11 P600.13 P600.15 PSM200.GND R603.P$1 R606.P$1 S600.B3 S602.B3 SPKT100.2 U601.6 U601.7 U601.8 U601.15 U601.16 U601.17 U603.4 U603.17 U603.20 U603.24 U603.26 U603.33 USB600.GND USB600.GND1 USB600.GND2 USB600.GND3 USB600.GND4 USB601.GND USB601.GND1 USB601.GND2 USB601.GND3 USB601.GND4 | length 505.7
  Top Layer w0.15: P304.GND@31,57.22 31.006,57.214 P200.GND@35.25,57.214 36.34,57.214 v2(37.478,57.214) ; 33.63,43.498 33.782,43.651 33.782,44.501 34.95,45.669 36.627,45.669 39.9,42.396 P202.6@39.9,38.604 ; P301.6@38.58,62.3 P301.5@38.58,59.76 46.539,59.76 P500.GND@46.914,59.385 ; P500.GND@46.914,29.388 42.672,33.63 38.786,33.63 38.329,34.087 38.329,34.231 38.237,34.231 38.237,34.91 38.653,35.326 42.26,35.326 48.793,41.859 P500.GND@49.697,41.859 ; C604.P$2@55.931,26.854 57.276,26.854 57.61,27.188 57.61,27.638 v2(58.258,28.286) ; 58.979,35.154 59.508,34.624 59.508,30.536 v2(59.258,30.286) ; U603.20@59.008,27.186 59.008,27.372 59.258,27.622 v2(59.258,28.286) ; v2(60.258,28.286) 60.508,28.036 60.906,27.638 60.906,27.188 U603.24@61.008,27.086 ; v1(61.189,62.052) 61.265,61.976 v1(71.831,61.976) 84.69,61.976 ; U603.26@61.358,28.036 61.764,28.036 62.1,27.7 62.752,27.7 ; LV605.2@62.9,29.5 62.936,29.464 62.936,28.186 LV605.5@62.9,28.15 62.9,27.848 62.752,27.7 ; LV604.2@64.6,29.5 v1(64.6,30.294) ; LV603.2@66.3,29.5 v1(66.3,30.271) ; v1(66.497,26.543) 63.909,26.543 62.752,27.7 ; v1(67.259,32.334) v1@67.417,32.492 ; v1(67.437,27.483) 67.593,27.483 68.1,27.989 LV601.5@68.1,28.15 68.052,28.198 68.052,29.452 LV601.2@68.1,29.5 ; P500.15@67.97,44.526 P500.13@68.453,44.526 68.453,41.91 68.732,41.631 68.961,41.859 P500.GND@73.711,41.859 73.787,41.859 v1(75.209,40.437) ; LV600.2@69.9,29.5 69.9,31.293 ; LV602.5@71.7,28.15 71.7,28.727 ; v1(71.704,29.921) 71.704,29.504 LV602.2@71.7,29.5 71.7,28.727 ; v1@73.076,32.156 73.076,33.68 74.097,34.702 75.037,34.702 75.209,34.874 v1(75.209,34.9) ; v1@74.346,27.94 73.301,28.985 71.957,28.985 71.7,28.727 ; P201.4@83.9,56.007 89.425,56.007 89.705,55.728 90.428,55.728 92.568,57.868 P101.GND@94.116,57.868 ; P201.GND@86.79,61.976 P201.GND@87.049,61.717 ; SPKT100.2@94.914,61.347 94.914,58.666 P101.GND@94.116,57.868 ; 96.718,56.775 95.626,57.868 P101.GND@94.116,57.868
  Top Layer w0.254: P304.GND@30.953,29.261 30.953,43.18 ; P304.GND@30.953,59.701 30.953,43.18 ; P304.GND@30.979,26.721 30.979,27.94 ; P304.GND@30.979,29.261 30.979,27.94 ; P304.GND@31,59.76 P304.GND@31,62.3 ; P200.GND@35.642,43.498 33.63,43.498 31.272,43.498 30.953,43.18 ; P202.GND@35.667,26.963 34.69,27.94 30.979,27.94 ; P200.GND@36.34,57.214 38.588,54.966 40.292,54.966 P200.5@40.292,52.934 ; 40.317,39.167 P202.6@40.419,39.065 ; U603.33@60.508,28.036 U603.26@61.358,28.036 ; v1@74.346,27.94 74.346,27.864 75.336,26.873 81.792,26.873 83.926,29.007 85.881,27.051 P107.GND@87.076,27.051 ; P102.4@84.026,43.84 85.22,43.84 P102.GND@87.176,41.885 ; P201.GND@87.049,51.562 87.049,49.672 87.176,49.545 87.176,47.639 87.19,47.625 87.176,47.611 P102.GND@87.176,41.885 ; P107.GND@87.19,39.612 87.076,39.726 87.076,40.792 ; 87.241,29.159 87.546,28.854 88.879,28.854 ; 91.769,40.792 87.076,40.792 ; 91.776,40.799 92.411,41.434 92.411,40.835 v1(91.917,40.342) 92.755,39.503 P100.GND@95.561,39.503 ; P109.6@92.027,28.854 88.879,28.854 ; 93.771,26.321 94.381,26.93 95.561,26.93 96.501,25.991 99.7,25.991 ; 93.8,26.314 87.812,26.314 P107.GND@87.076,27.051 ; 94.102,51.59 94.116,51.604 P101.GND@94.116,51.467 ; 94.116,51.104 95.561,49.658 96.734,50.832 P104.4@100.412,50.832 ; P109.GND@95.561,37.085 95.561,38.36 ; v1(96.21,38.335) 95.586,38.335 95.561,38.36 ; 96.718,56.775 97.734,56.775 ; 96.809,56.781 P104.GND@103.317,56.781 ; v2(97.961,29.986) v2(97.961,30.986) ; v2(98.461,30.486) v2(98.961,29.986) 98.961,29.905 100.412,28.454 ; v1(99.453,47.408) 103.594,47.408 P108.GND@104.011,46.991 ; 99.656,25.97 100.723,27.037 101.663,27.037 100.861,27.839 100.861,28.434 102.039,29.612 103.806,29.612 104.396,30.202 104.396,31.969 105.574,33.147 105.574,36.232 104.614,37.192 104.011,37.192 P108.GND@104.011,39.331 ; P108.4@100.412,41.307 97.364,41.307 P100.GND@95.561,39.503 ; P108.4@100.861,41.286 102.055,41.286 P108.GND@104.011,39.331 ; P104.4@100.861,50.811 102.817,48.856 104.011,48.856 P108.GND@104.011,46.991 ; 101.214,27.057 P103.GND@103.562,27.057 ; 103.745,55.18 103.745,56.251 104.011,56.516 P104.GND@103.766,56.761 ; P107.GND@87.076,27.051 88.879,28.854 ; 87.076,40.792 87.076,41.784 P102.GND@87.176,41.885 ; 95.561,38.36 P100.GND@95.561,39.503 ; P108.GND@104.011,39.331 104.011,41.247 104.787,42.023 104.011,42.799 P108.GND@104.011,46.991
  Top Layer w0.8: P202.GND@35.642,41.554 35.743,41.453 36.058,41.768 ; 40.317,37.186 40.317,39.167
  Signal Layer 2 w0.15: v2(60.258,29.286) v2(60.258,30.286)
  Signal Layer 1 w0.15: v1(71.704,29.921) 73.076,31.293 v1@73.076,32.156 ; v1@74.524,28.118 74.727,27.915 75.438,27.915 P500.GND@76.911,29.388 ; v1(75.209,34.9) 75.255,34.945 75.255,36.281 75.23,36.306 75.23,40.533 75.209,40.513 v1(75.209,40.437)
  Bottom Layer w0.15: v2(37.478,57.214) 38.58,58.316 P301.5@38.58,59.76 ; D301.A@41.139,30.861 41.605,30.861 42.033,30.433 42.033,27.534 43.201,26.365 44.704,26.365 44.729,26.34 51.101,26.34 USB600.GND4@51.889,27.127 ; P500.GND@46.914,29.388 48.724,27.577 USB600.GND4@51.889,27.577 ; 52.045,61.445 51.361,62.129 59.96,62.129 S600.B3@60.1,61.99 ; PSM200.GND@52.276,32.436 52.276,31.21 USB600.GND@53.539,29.947 52.847,29.947 USB600.GND3@52.339,29.439 52.339,27.577 USB600.GND4@51.889,27.577 ; P105.6@56.661,60.179 57.559,61.077 58.644,61.077 59.557,61.99 S600.B3@60.1,61.99 ; USB600.GND1@57.81,27.127 57.81,26.416 57.15,25.756 53.26,25.756 USB600.GND4@51.889,27.127 ; C605.P$2@59.842,27.172 59.842,27.87 v2(60.258,28.286) v2(59.258,28.286) v2(58.258,28.286) v2(58.258,29.286) v2(58.258,30.286) v2(59.258,30.286) v2(59.258,29.286) v2(60.258,29.286) ; v1(61.189,62.052) 60.162,62.052 S600.B3@60.1,61.99 ; v1(64.6,30.294) 65.38,29.515 USB601.GND3@66.918,29.515 ; USB601.GND3@66.918,30.135 68.107,31.323 68.183,31.323 ; v1(67.437,27.483) USB601.GND4@66.748,27.483 ; USB601.GND@68.118,29.926 68.052,29.86 68.052,29.072 67.86,28.88 67.553,28.88 USB601.GND3@66.918,29.515 ; S602.B3@70.565,61.99 71.817,61.99 v1(71.831,61.976) ; v1(71.704,29.921) USB601.GND2@71.933,29.693 ; USB601.GND2@71.933,28.558 71.933,27.661 USB601.GND1@72.288,27.305 ; USB601.GND2@71.933,29.515 USB601.GND2@72.428,30.01 ; P600.15@73.207,34.11 P600.13@73.613,34.11 P600.11@74.02,34.11 ; P600.9@74.401,34.11 P600.11@74.02,34.11 ; 74.414,28.608 74.524,28.499 v1(74.524,27.94) ; R606.P$1@74.439,26.068 73.525,26.068 USB601.GND1@72.39,27.203 70.993,25.806 67.865,25.806 USB601.GND4@66.468,27.203 USB601.GND4@66.748,27.483 ; v1@75.209,34.702 74.224,34.702 74.02,34.497 P600.11@74.02,34.11 ; P600.5@75.213,34.11 v1@75.213,34.87 ; v1@75.362,34.747 75.726,34.747 75.924,34.549 75.924,34.187 P600.1@76.001,34.11 ; P106.GND@83.661,61.926 P106.GND@90.261,61.926 ; D102.A@94.432,59.823 94.432,60.865 SPKT100.2@94.914,61.347 ; U601.17@97.861,30.486 U601.17@98.111,30.236 ; USB600.GND4@51.889,27.127 USB600.GND4@51.889,27.577 ; USB601.GND4@66.748,27.483 66.918,27.653 USB601.GND3@66.918,29.515
  Bottom Layer w0.254: P304.GND@31.334,30.099 36.008,30.099 ; 36.008,29.515 36.008,30.099 ; 36.008,30.217 36.008,30.099 ; L300.GND@38.538,29.6 38.04,30.099 36.008,30.099 ; L300.GND@39.627,29.705 40.783,30.861 D301.A@41.139,30.861 ; PSM200.GND@52.045,55.173 52.045,61.445 ; 88.961,59.976 88.961,60.626 P106.GND@90.261,61.926 ; P106.GND@90.645,61.932 90.873,62.16 94.102,62.16 SPKT100.2@94.914,61.347 ; v1@96.198,38.347 v1(96.21,38.335) ; U601.15@98.211,29.011 98.211,30.236 v2(98.461,30.486) 98.711,30.736 U601.7@98.711,31.961 ; BATT600.2@98.33,44.66 98.33,46.73 99.008,47.408 v1(99.453,47.408) ; C602.P$2@103.22,33.147 104.147,33.147 104.4,33.4 ; 103.745,55.18 103.796,55.18 ; 104.304,55.383 104.338,55.35 104.338,38.956 104.4,33.4 ; L101.GND@104.338,34.735 104.4,33.4 ; L101.GND@104.338,35.541 104.4,33.4
  Bottom Layer w0.4: U601.6@98.211,31.961 U601.7@98.711,31.961 U601.8@99.211,31.961 99.211,33.172
  other v1: 69.621,31.267 73.05,32.106
  other v2: 98.961,30.986
GP12_PWM0: P600.35
GP13_PWM1: P600.33
GP14: P600.48
GP15: P600.42
GP40: P600.52 | length 2.4
  Top Layer w0.15: v1@67.31,35.992 67.31,35.916 v1(67.437,35.916)
  Bottom Layer w0.15: P600.52@65.996,36.932 65.996,36.366 66.273,36.089 67.213,36.089 67.31,35.992 67.31,35.916 v1(67.437,35.916)
GP41: P600.54 | length 1.3
  Top Layer w0.15: v1(64.973,36.068) v1@64.999,36.043
  Bottom Layer w0.15: v1(64.973,36.068) 65.151,36.068 65.597,36.514 P600.54@65.597,36.932
GP42: P600.50
GP43: P600.56
GP44: P600.24
GP45: P600.26
GP46: P600.28
GP47: P600.30
GP48: P600.32
GP49: P600.34
GP165: P600.25
GP182_PWM2: P600.37
GP183_PWM3: P600.39
I2C_1_SCL: P107.4 P500.37 | length 53.1
  Top Layer w0.15: P500.37@62.459,44.526 62.459,45.665 62.961,46.168 62.961,47.925 63.043,48.006 64.592,48.006 v1(64.668,47.93)
  Top Layer w0.254: P107.4@83.9,33.875 90.433,33.875 v1(90.703,33.604)
  Signal Layer 2 w0.15: v1(64.668,47.93) 86.803,47.93 86.903,48.03 87.477,48.03 87.577,47.93 90.365,47.93 ; 90.371,47.936 90.749,47.936 91.104,47.581 v1(91.104,47.555)
  Signal Layer 1 w0.15: v1@90.678,33.604 90.678,47.129 v1(91.104,47.555)
I2C_1_SCL_ED: P600.41
I2C_1_SDA: P107.5 P500.35 | length 49
  Top Layer w0.15: v1(62.916,45.441) 62.967,45.491 P500.35@62.967,44.526
  Top Layer w0.254: P107.5@83.9,32.615 84.38,32.615 85.01,33.245 89.666,33.245 v1(89.891,33.02)
  Signal Layer 2 w0.15: v1(62.916,45.441) 63.647,46.172 64.957,46.172 65.079,46.05 66.167,46.05 67.31,47.193 84.091,47.193 85.234,46.05 v1@89.4,46.05
  Signal Layer 1 w0.15: v1@89.501,46.126 89.857,45.771 ; 89.863,45.777 90.241,45.777 90.241,33.325 90.195,33.325 v1(89.891,33.02)
  other v1: 89.4,46.126
I2C_1_SDA_ED: P600.43
I2C_2_SCL: P102.2 P109.4 P500.6 | length 48.9
  Top Layer w0.15: v1@69.926,40.513 v1(69.952,40.488) 70.46,39.98 P500.6@70.46,39.209 ; v1(82.567,46.507) 82.567,46.38 82.603,46.345 P102.2@84.026,46.345
  Top Layer w0.254: v1(81.686,32.233) 81.863,32.056 85.316,32.056 85.567,31.805 85.985,31.805 86.307,32.127 88.245,32.127 88.567,31.805 91.91,31.805 P109.4@92.35,31.365
  Signal Layer 2 w0.15: v1(69.444,45.593) 70.764,45.593 71.679,46.507 v1(82.567,46.507)
  Signal Layer 1 w0.15: v1(69.444,45.593) 69.444,45.618 69.952,45.11 v1(69.952,40.488) ; v1(81.686,32.233) 81.686,34.171 81.805,34.29 81.711,34.384 81.787,34.46 81.787,38.842 82.069,38.842 82.333,39.107 82.333,39.481 82.158,39.656 82.158,39.677 82.006,39.83 82.006,40.445 82.008,40.448 82.008,42.266 82.593,42.85 82.593,46.736 82.567,46.711 v1(82.567,46.507)
I2C_2_SDA: P102.3 P109.5 P500.4 | length 44
  Top Layer w0.254: P500.4@70.968,39.209 71.069,39.108 71.069,38.545 71.218,38.396 71.924,38.396 v1(72.06,38.532) ; P102.3@84.026,45.085 84.077,45.034 85.717,45.034 85.717,45.06 v1(85.844,45.187) ; v1(86.97,31.572) 87.374,31.572 88.826,30.12 P109.5@92.35,30.12
  Signal Layer 2 w0.254: v1(72.365,45.06) 72.365,45.085 72.466,45.187 v1(85.844,45.187)
  Signal Layer 1 w0.15: v1(85.844,45.187) 85.844,38.572 86.376,38.04 86.376,32.843 86.97,32.25 v1(86.97,31.572)
  Signal Layer 1 w0.254: v1(72.06,38.532) 72.085,38.557 72.085,43.037 72.157,43.11 72.157,44.852 v1(72.365,45.06)
I2C_6_SCL: P600.45
I2C_6_SDA: P600.47
I\O\-\L\E\D\_\S\A\F\E\T\_\P\R\O\T\: P107.7 P500.28 | length 31.7
  Top Layer w0.15: P500.28@64.948,39.209 64.948,39.673 65.298,40.023 65.298,40.497 65.245,40.55 65.245,40.552 65.527,40.834 65.527,40.914 65.583,40.97 v1(66.7,40.97) ; v1@82.918,30.638 82.918,30.384 83.126,30.175 83.202,30.251 P107.7@83.926,30.251
  Signal Layer 2 w0.15: v1(66.7,40.97) 66.675,40.97 66.65,40.996 71.08,40.996 71.174,41.09 82.168,41.09 v1(82.542,40.716)
  Signal Layer 1 w0.15: v1@82.669,40.716 82.283,40.33 82.283,39.944 82.435,39.792 82.435,39.771 82.61,39.596 82.61,38.992 82.183,38.565 82.064,38.565 82.064,34.822 82.257,34.63 82.257,34.255 82.074,34.072 82.074,32.484 82.138,32.42 82.138,32.045 82.074,31.981 82.074,31.679 v1(82.918,30.836)
IO-!RESET: P500.75
IO-CH1-PROT: P304.7 P500.80 | length 29.5
  Top Layer w0.15: v1(51.435,38.938) 51.359,39.014 51.359,39.091 51.477,39.209 P500.80@51.947,39.209
  Signal Layer 2 w0.254: P304.7@25.899,41.961 27.118,43.18 31.569,43.18 32.194,42.555 32.194,41.825 34.243,39.776 49.22,39.776 49.89,39.107 49.89,38.933 50.185,38.637 50.602,38.637 50.872,38.907 50.973,38.806 51.303,38.806 v1(51.435,38.938)